# Altium PCB Spider Remote.PcbDoc
Units mm, origin at the board's own origin, x right, y up, seen from the top; angles counter-clockwise.
Board outline 49.15 x 64.13 mm, 2 copper layers (Top Layer, Bottom Layer); 14 components, 27 nets, 81 pads, 13 vias.
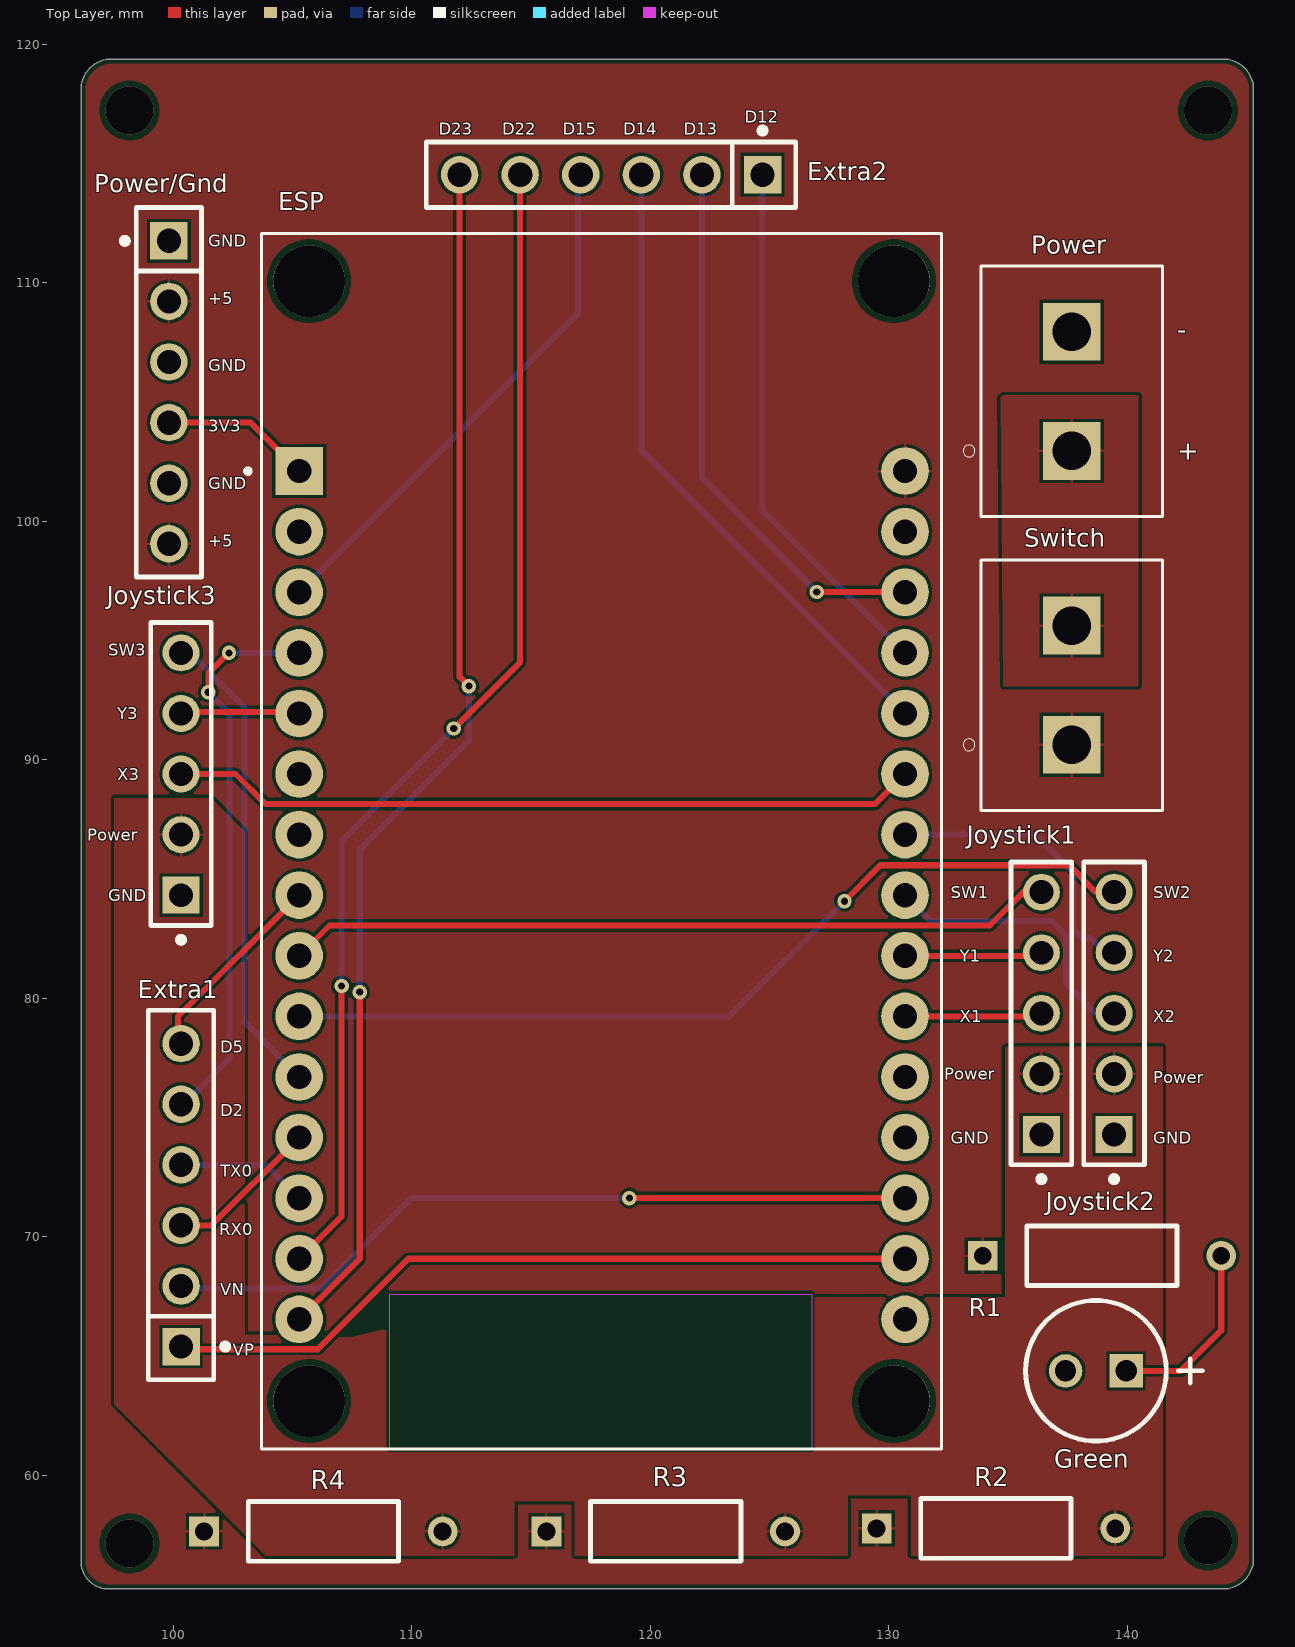
[diagram p0: Top Layer view]
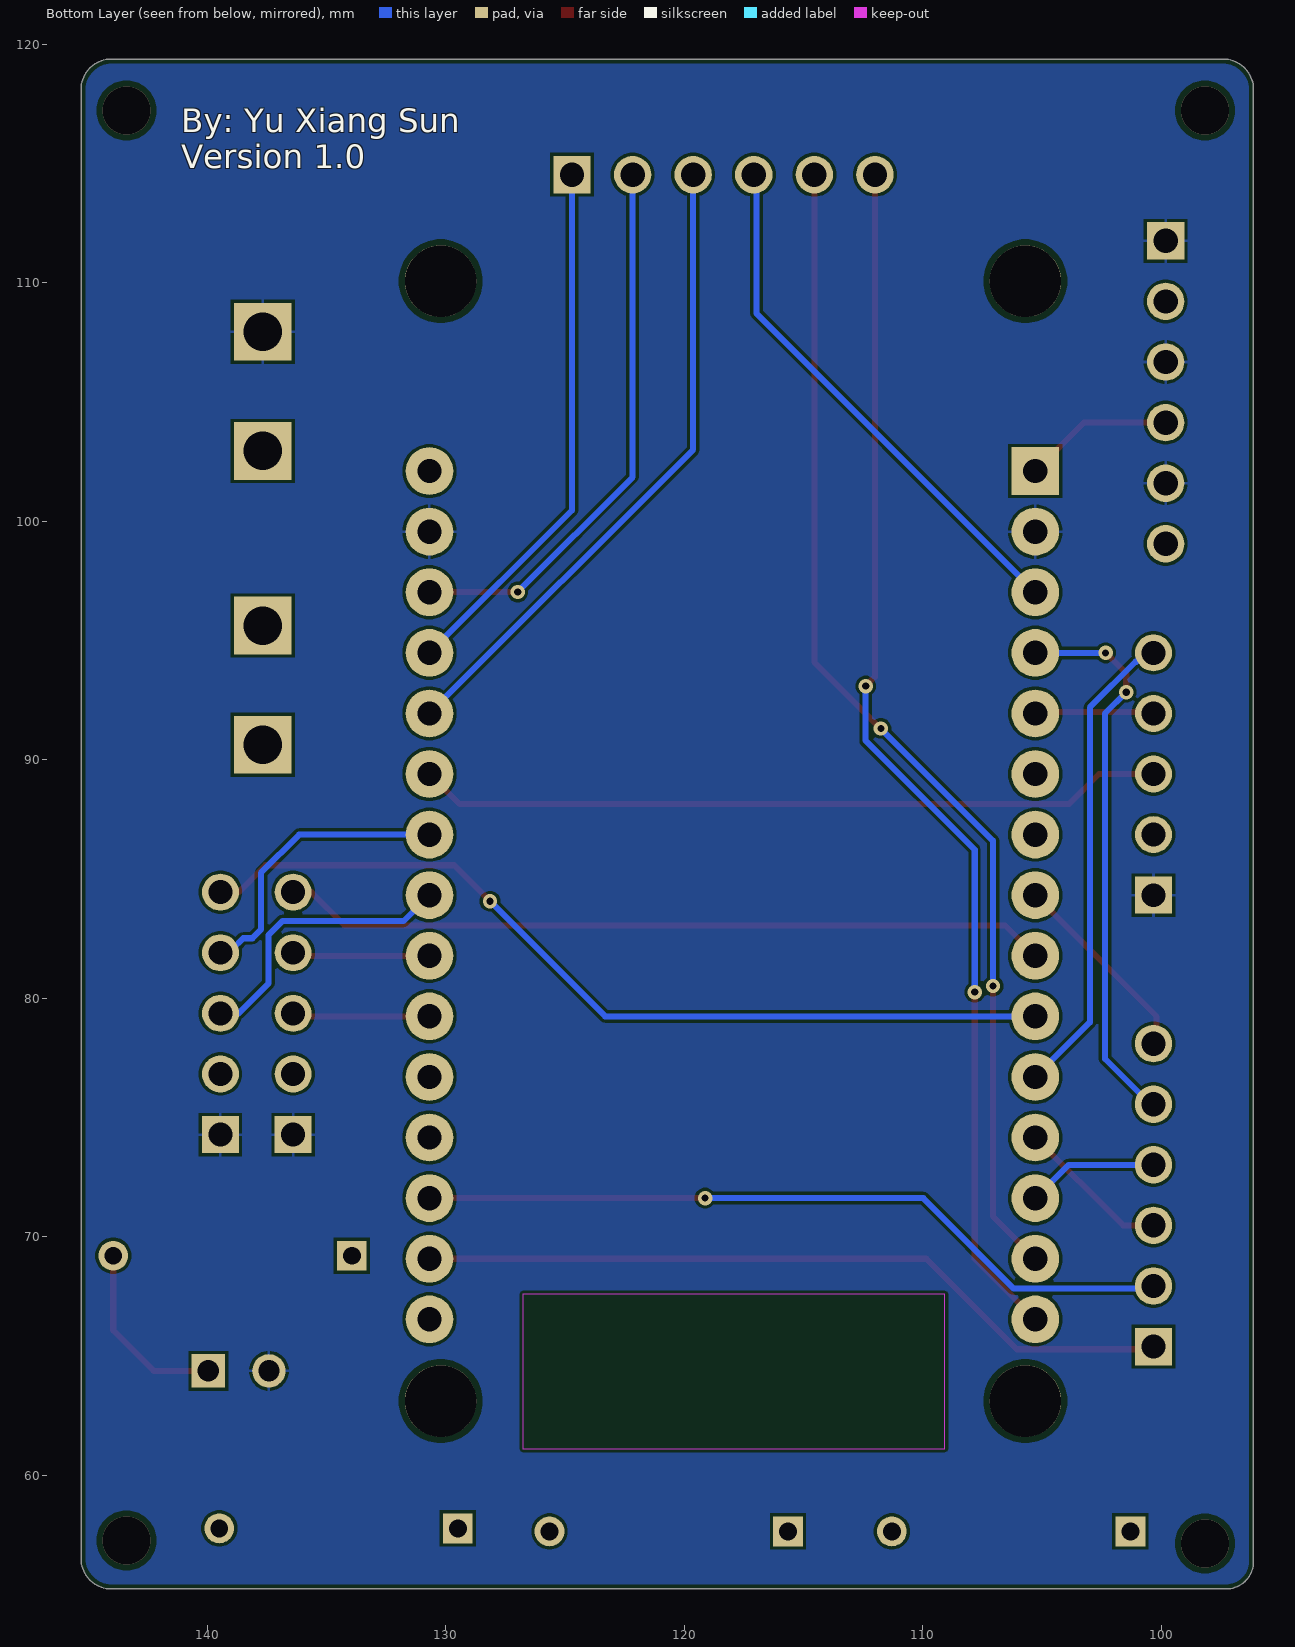
[diagram p1: Bottom Layer view, seen from below]
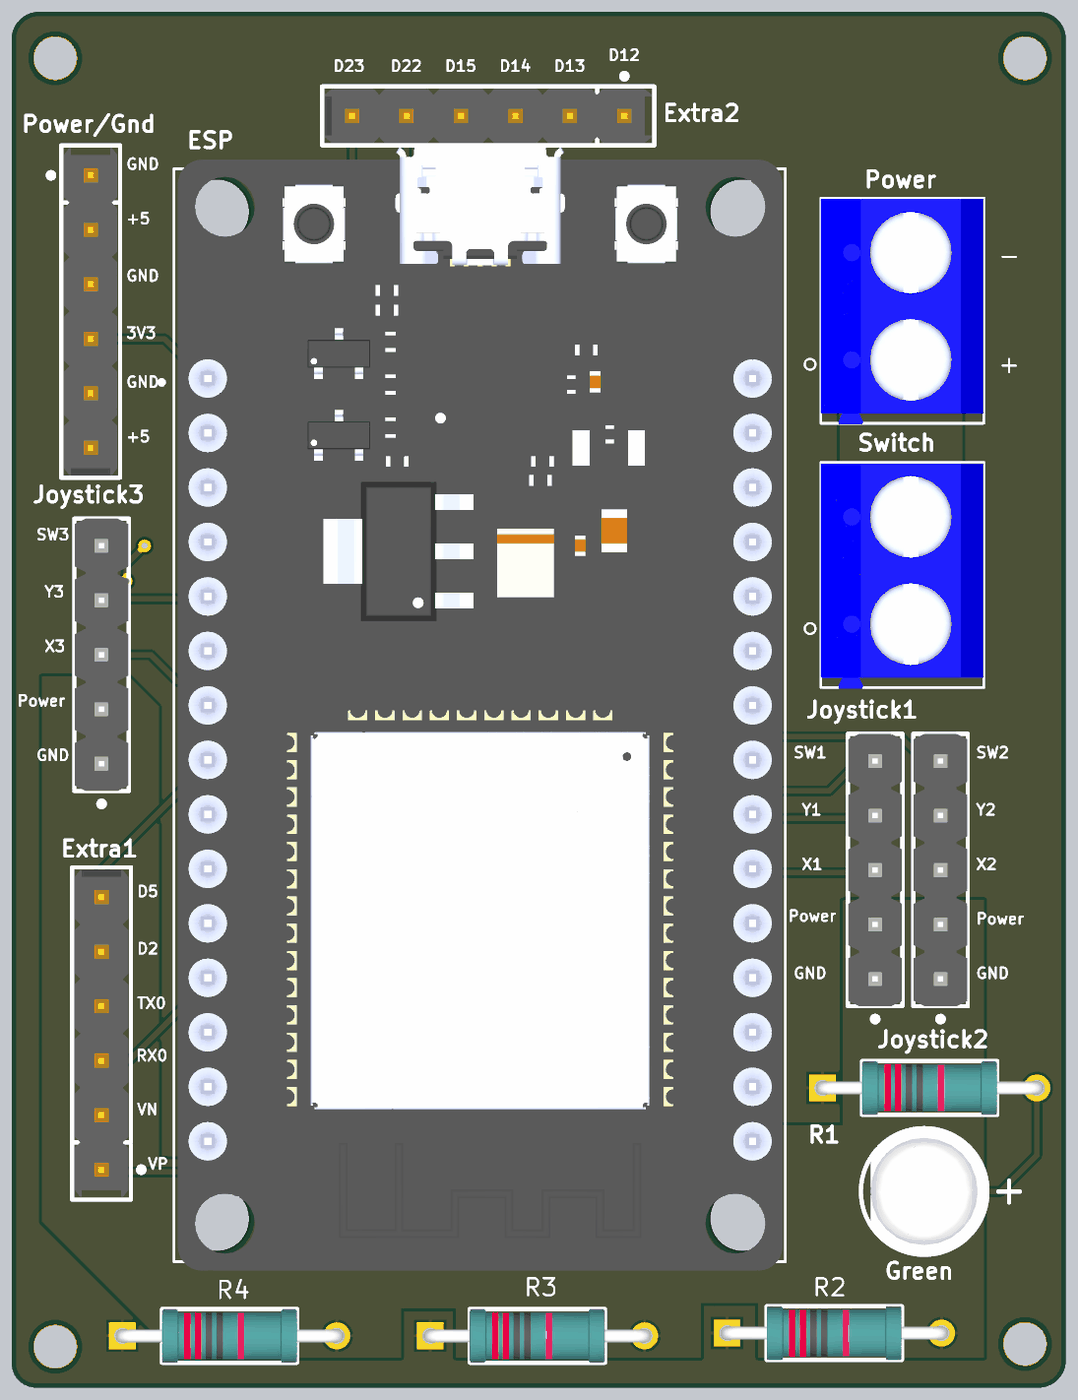
[diagram p2: 3D render of the assembled board from above, using the file's embedded part models]

## Layer stack, top to bottom
Top Solder: solder mask 0.0102, Solder Resist, Dk 3.5
Top Layer: signal copper 0.0356
Dielectric 1: dielectric 0.32, FR-4, Dk 4.8
Bottom Layer: signal copper 0.0356
Bottom Solder: solder mask 0.0102, Solder Resist, Dk 3.5

## Board outline
96.139,56.388 ccw(c97.282,56.388) 97.282,55.245 144.018,55.245 ccw(c144.018,56.515) 145.288,56.515 145.288,118.11 ccw(c144.018,118.11) 144.018,119.38 97.409,119.38 ccw(c97.409,118.11) 96.139,118.11

## Design rules (kind name [scope] priority, off if disabled: settings)
BoardOutlineClearance [All] p1: gap=0.2 ignorepadtopadclearanceinfootprint=FALSE
Clearance [All] p1: gap=0.127 ignorepadtopadclearanceinfootprint=FALSE except(0.25: Arc-Hole Track-Hole SMDPad-Hole THPad-Hole Via-Hole Fill-Hole Poly-Hole Region-Hole Text-Hole)
ComponentClearance [All] p1: gap=0.127 collisioncheckmode=3 verticalgap=0.127 showdistances=TRUE
DiffPairsRouting [All] p1: maxlimit=0.254 minlimit=0.127 mostfreqgap=0.127 toplayer_minwidth=0.127 toplayer_maxwidth=25.4 toplayer_prefwidth=0.127 bottomlayer_minwidth=0.127 bottomlayer_maxwidth=25.4 bottomlayer_prefwidth=0.127 maxuncoupledlength=12.7
Height [All] p1: minheight=0 maxheight=1816.048 prefheight=12.7
HoleSize [All] p1: absolutevalues=TRUE maxlimit=6.3 minlimit=0.3 maxpercent=80.000 minpercent=20.000
HoleToHoleClearance [All] p1: gap=0.25 allowstackedmicrovias=FALSE
MinimumAnnularRing [All] p1: minimumring=0.076
MinimumSolderMaskSliver [All] p1: minsoldermaskwidth=0
PlaneClearance [All] p1: clearance=0.127
PlaneConnect PlaneConnectPowerPads [InPadClass('PowerPads')] p1: planeconnectstyle=Direct reliefexpansion=0.508 reliefentries=4 reliefconductorwidth=0.254 reliefairgap=0.254
PlaneConnect [All] p2: pad.planeconnectstyle=Relief pad.reliefexpansion=0.3 pad.reliefentries=4 pad.reliefconductorwidth=0.127 pad.reliefairgap=0.127 via.planeconnectstyle=Direct via.reliefexpansion=0.3 via.reliefentries=4 via.reliefconductorwidth=0.127 via.reliefairgap=0.127
PolygonConnect PolygonConnectPowerPads [All vs (InPadClass('PowerPads'))] p1: connectstyle=Direct reliefconductorwidth=0.254 reliefentries=4 polygonreliefangle="90 Angle" airgapwidth=0.254
PolygonConnect [All] p2: thpad.connectstyle=Relief thpad.reliefconductorwidth=0.127 thpad.reliefentries=4 thpad.polygonreliefangle="90 Angle" thpad.airgapwidth=0.127 smdpad.connectstyle=Relief smdpad.reliefconductorwidth=0.127 smdpad.reliefentries=4 smdpad.polygonreliefangle="90 Angle" smdpad.airgapwidth=0.127 via.connectstyle=Direct via.reliefconductorwidth=0.127 via.reliefentries=4 via.polygonreliefangle="90 Angle" via.airgapwidth=0.127
RoutingVias [All] p1: holewidth=0.3 width=0.6 viastyle="Through Hole" minholewidth=0.3 minwidth=0.6 maxholewidth=0.6 maxwidth=6.6
SilkToSilkClearance [All] p1: silktosilkclearance=0
SilkToSolderMaskClearance [IsPad] p1: minsilkscreentomaskgap=0.127 clearancetoexposedcopper=TRUE
SolderMaskExpansion [All] p1: expansion=0.075 istentingtop=FALSE
SupplyNets "Schematic Supply Nets_2" [InNet('3V3')] p1: voltage=0.000
SupplyNets "Schematic Supply Nets_1" [InNet('+5')] p2: voltage=0.000
SupplyNets "Schematic Supply Nets" [InNet('GND')] p3: voltage=0.000
Width [All] p1: maxlimit=25.4 minlimit=0.127 preferedwidth=0.127 minimp=50.000000 maximp=50.000000 favimp=50.000000
20 further rules are at their usual default settings.

## Components (designator, comment, footprint, x,y, rotation, side; value= is the part's Value field where it differs from the comment)
ESP "ESP32-DEVKIT-V1" MODULE_ESP32_DEVKIT_V1 117.983,86.593 r0 top
Extra1 "6 Pin" FP-22-28-4063-MFG 100.33,71.755 r90 top
Extra2 "6 Pin" FP-22-28-4063-MFG 118.357,114.531 r180 top
Green "LED" KING-WP7113SGD_V 138.684,64.389 r180 top
Joystick1 "5 Pin" FP-90120-0125-MFG 136.398,79.375 r90 top
Joystick2 "5 Pin" FP-90120-0125-MFG 139.446,79.375 r90 top
Joystick3 "5 Pin" FP-90120-0125-MFG 100.33,89.408 r90 top
Power "Terminal" EBBA-02-C-SS-BU 137.668,102.95 r90 top
Power/Gnd "6 Pin" FP-22-28-4063-MFG 99.822,105.41 r270 top
R1 "10k" FP-MBB0207-MFG 138.938,69.215 r0 top
R2 "1.8k" FP-MBB0207-MFG 134.493,57.785 r0 top
R3 "1.8k" FP-MBB0207-MFG 120.65,57.658 r0 top
R4 "1.8k" FP-MBB0207-MFG 106.299,57.658 r0 top
Switch "Terminal" EBBA-02-C-SS-BU 137.668,90.631 r90 top

## Footprints (in the part's own frame and the unit in brackets; to place one, negate y for a bottom-side part, rotate by r counter-clockwise, add the part's x,y. Pads: shape width x height; smd on the part's side, far side on the other; paste and mask are expansions set on the pad)
EBBA-02-C-SS-BU [mm]
  rect 2.421x2.421 / inner round 2.421 / far side rect 2.421x2.421 hole 1.614: 1(0,0) 2(5,0)
  silkscreen extent -2.75,-3.8 7.75,4.55, body extent -2.79,-3.79 7.71,3.81, height 10
FP-22-28-4063-MFG [mm]
  rect 1.57x1.57 hole 1.02 paste-2539.97 mask+0: 1(-6.35,0)
  round 1.57 hole 1.02 paste-2539.97 mask+0: 2(-3.81,0) 3(-1.27,0) 4(1.27,0) 5(3.81,0) 6(6.35,0)
  silkscreen extent -7.75,-1.97 7.75,1.37, body extent -7.85,-1.47 7.85,1.47, height 0.25
FP-90120-0125-MFG [mm]
  rect 1.55x1.55 hole 1 paste-2539.97 mask+0: 1(-5.08,0)
  round 1.55 hole 1 paste-2539.97 mask+0: 2(-2.54,0) 3(0,0) 4(2.54,0) 5(5.08,0)
  silkscreen extent -7.07,-1.27 6.35,1.27, body extent -6.45,-1.37 6.45,1.37, height 0.25
FP-MBB0207-MFG [mm]
  rect 1.25x1.25 hole 0.75 paste-2539.97 mask+0: 1(-5,0)
  round 1.25 hole 0.75 paste-2539.97 mask+0: 2(5,0)
  silkscreen extent -3.15,-1.25 3.15,1.25, body extent -5.72,-1.35 5.72,1.35, height 0.25
KING-WP7113SGD_V [mm] "THD, 2-Leads, Dia 5.9mm, Body Length 8.6mm"
  rect 1.4x1.4 hole 0.889: 1(-1.27,0)
  round 1.4 hole 0.889: 2(1.27,0)
  silkscreen extent -4.47,-2.95 2.95,2.95, body extent -2.95,-2.95 2.5,2.95, height 15.5
MODULE_ESP32_DEVKIT_V1 [mm]
  rect 2x2 / inner round 2 / far side rect 2x2 hole 1.02: 1(-12.7,15.515)
  round 2 hole 1.02: 2(-12.7,12.975) 3(-12.7,10.435) 4(-12.7,7.895) 5(-12.7,5.355) 6(-12.7,2.815) 7(-12.7,0.275) 8(-12.7,-2.265) 9(-12.7,-4.805) 10(-12.7,-7.345) 11(-12.7,-9.885) 12(-12.7,-12.425) 13(-12.7,-14.965) 14(-12.7,-17.505) 15(-12.7,-20.045) 16(12.7,-20.045) 17(12.7,-17.505) 18(12.7,-14.965) 19(12.7,-12.425) 20(12.7,-9.885) 21(12.7,-7.345) 22(12.7,-4.805) 23(12.7,-2.265) 24(12.7,0.275) 25(12.7,2.815) 26(12.7,5.355) 27(12.7,7.895) 28(12.7,10.435) 29(12.7,12.975) 30(12.7,15.515)
  round 3 hole 3 unplated: ""(-12.28,-23.475) ""(-12.28,23.475) ""(12.23,-23.475) ""(12.23,23.475)
  Keep-Out Layer region: 8.78,-25.475 -8.91,-25.475 -8.91,-18.985 8.78,-18.985
  Keep-Out Layer region: 8.78,-25.475 -8.91,-25.475 -8.91,-18.985 8.78,-18.985
  silkscreen extent -14.95,-25.48 14.23,25.48, body extent -14.1,-25.9 14.1,26.55, height 7.05

## Part data
ESP: library part CMP-003-000000-1, "Dual core, Wi-Fi: 2.4 GHz up to 150 Mbits/s,BLE (Bluetooth Low Energy) and legacy Bluetooth, 32 bits, Up to 240 MHz", Package=None, Check_prices=https://www.snapeda.com/parts/ESP32-DEVKIT-V1/Do+it/view-part/?ref=eda, Component Type=Standard, Design Item ID=ESP32-DEVKIT-V1, MF="Do it", MP=ESP32-DEVKIT-V1, Pin Count=30, SnapEDA_Link=https://www.snapeda.com/parts/ESP32-DEVKIT-V1/Do+it/view-part/?ref=snap, Source=ESP32-DEVKIT-V1.SchLib
Extra1 Extra2 Power/Gnd: library part CMP-04776-000885-1, "CONN HEADER VERT 6POS 2.54MM", Color=Black, Contact Resistance=20mR, Current Rating=4A, Flammability Rating="UL94 V-0", Max Operating Temperature=75°C, Max Voltage Rating (AC)=250V, Max Voltage Rating (DC)=250.25kV, Min Operating Temperature=0°C, Package Quantity=1, Connector Type="Male Pin", Contact Material=Brass, Contact Mating Length=0.24inch, Contact Plating=Gold, Contact Type="Male Pin", Depth=2.49mm, Gender=Male, Glow Wire Compliant=Non-compliant, Housing Color=Black, Housing Material=Thermoplastic, Lead Free="Lead Free", Mount="Through Hole", Number of Circuits=6, Number of Contacts=6, Number of Positions=6, Number of Rows=1, Orientation=Straight, Packaging=Bulk, Pitch=2.54mm, Radiation Hardening=No, RoHS Compliant=Yes, Series="KK® 42375", Termination=Solder, Voltage Rating=250V, Voltage Rating (DC)=250V
Green: library part CMP-2100-03698-1, "LED Green, 62.5 mW, 25 mA, -40 to 85 degC, 2-Pin THD, RoHS, Bulk", Case/Package=Radial, Colour=Green, Forward Voltage=2.2V, Manufacturer=Kingbright, Package Description="2-Pin Through Hole Device, Dia 5.9 mm, Body Length 8.6 mm", Package Quantity=1000, Package Reference=WP7113SGD, Test Current=20mA, Datasheet URL=http://www.kingbrightusa.com/images/catalog/SPEC/WP7113SGD.pdf, Datasheet Version="Rev. 6B, 01/2015", Dominant Wavelength=568nm, Height=8.6mm, Illumination Colour=Green, Lead Free=LeadFree, Lens Style=Tinted, Luminous Intensity=40mcd, Packaging=Bulk, RoHSCompliant=true, Viewing Angle=30degrees, Wavelength=568nm
Joystick1 Joystick2 Joystick3: library part CMP-00257-00655425-1, "90120-0125 2.54mm Pitch C-Grid III Header, Single Row, Vertical, 5 Circuits, Tin (Sn) Plating", Contact Resistance=20mΩ, Current Rating=3A, Housing Color=Black, Manufacturer Lifecycle Status=ACTIVE, Max Operating Temperature=125°C, Max Voltage Rating (DC)=350.35kV, Min Operating Temperature=-55°C, Voltage Rating=350V, Contact Gender=Male, Contact Material=Brass, Contact Plating=Tin, Country of Origin=SK, Gender=Male, Glow Wire Compliant=Non-compliant, Housing Material=Polyester, Lead Free="Lead Free", Lead Length=2.9mm, Lead Pitch=2.54mm, Lifecycle Status=Production, Mating Post Length=6.75mm, Mount="Through Hole", NexarPartId=655425, Number of Circuits=5, Number of Contacts=5, Number of Pins=5, Number of Positions=5, Number of Rows=1, Orientation=Vertical, Packaging=Bulk, Pitch=2.54mm, Plating=Tin, Radiation Hardening=No, REACH SVHC="No SVHC", RoHS=Compliant, Schedule B=8536694040, Termination=Solder, Voltage Rating (AC)=350V
Power Switch: library part CMP-002-00072-2, "Terminal block, EURO BLOCK, slotted screw, 5.00mm pitch, blue, 2 position", Case/Package=None, Check_prices=https://www.snapeda.com/parts/EBBA-02-C-SS-BU/Adam+Tech/view-part/?ref=eda, Component Type=Standard, Design Item ID=EBBA-02-C-SS-BU, MF="Adam Tech", MP=EBBA-02-C-SS-BU, Pins=2, SnapEDA_Link=https://www.snapeda.com/parts/EBBA-02-C-SS-BU/Adam+Tech/view-part/?ref=snap, Source=EBBA-02-C-SS-BU.SchLib
R1 R2 R3 R4: library part CMP-02408-000035-1, "RES 10K OHM 0.6W 1% AXIAL", Case/Package=Conformal, Max Operating Temperature=155°C, Max Power Dissipation=600mW, Min Operating Temperature=-55°C, Resistance=10kR, Resistance Tolerance=1%, Resistor Type="Metal Film", Temperature Coefficient=50ppm/°C, Voltage Rating=300V, Construction=Cylindrical, Contact Plating=Tin, Diameter=2.5mm, Features="Automotive AEC-Q200", Lead Free="Lead Free", Length=6.5mm, Military Standard=Not, Number of Terminations=2, Packaging="Tape and Reel", Power Rating=600mW, Radiation Hardening=No, RoHS Compliant=Yes, Series="MBB 0207 - Professional", Technology="THIN FILM", Termination=Axial, Tolerance=1%, Voltage Rating (DC)=300V

## Via types
v1: diameter 0.6, hole 0.3, Top Layer to Bottom Layer, 9 vias
v2: diameter 2, hole 2, Top Layer to Bottom Layer, 4 vias

## Nets (pads, with @x,y where several pads share a name; then routed paths per layer and width w, separated by ;. In a path a pad name is that pad's centre, name@x,y a point inside that pad or via, vN(x,y) a via of type N, cw(c..) or ccw(c..) an arc to the next point about the centre after c; other vN are vias at no path point)
3V3: ESP.1 Power/Gnd.4 | length 6.3
  Top Layer w0.254: Power/Gnd.4 103.251,104.14 ESP.1
+5: ESP.30 Power/Gnd.2 Power/Gnd.6 R1.1 R2.1 R3.1 R4.1 Switch.1
D2: ESP.4 Extra1.5 | length 23.5
  Top Layer w0.254: v1(101.473,92.837) 101.473,93.624 v1(102.337,94.488)
  Bottom Layer w0.254: Extra1.5@100.393,75.501 102.362,77.47 102.362,91.948 v1(101.473,92.837) ; v1(102.337,94.488) ESP.4
D5: ESP.8 Extra1.6 | length 8.3
  Top Layer w0.254: Extra1.6@100.203,78.105 100.203,79.248 ESP.8
D12: ESP.27 Extra2.1 | length 22.5
  Bottom Layer w0.254: Extra2.1 124.707,100.464 ESP.27
D13: ESP.28 Extra2.2 | length 23.2
  Top Layer w0.254: v1(126.981,97.04) 126.987,97.034 130.677,97.034 ESP.28
  Bottom Layer w0.254: Extra2.2 122.167,101.854 v1(126.981,97.04)
D14: ESP.26 Extra2.3 | length 27.2
  Bottom Layer w0.254: Extra2.3 119.627,103.004 ESP.26
D15: ESP.3 Extra2.4 | length 22.3
  Bottom Layer w0.254: ESP.3 116.967,108.712 Extra2.4@116.967,114.531
D22: ESP.14 Extra2.5 | length 49.3
  Top Layer w0.254: ESP.14 107.061,70.866 v1(107.061,80.518) ; v1(111.76,91.313) 114.547,94.1 Extra2.5
  Bottom Layer w0.254: v1(107.061,80.518) 107.061,86.614 v1(111.76,91.313)
D23: ESP.15 Extra2.6 | length 51.1
  Top Layer w0.254: ESP.15 107.823,69.088 v1(107.823,80.264) ; Extra2.6 112.007,93.479 v1(112.395,93.091)
  Bottom Layer w0.254: v1(107.823,80.264) 107.823,86.233 112.395,90.805 v1(112.395,93.091)
GND: ESP.2 ESP.29 Green.2 Joystick1.1 Joystick2.1 Joystick3.1 Power.2 Power/Gnd.1 Power/Gnd.3 Power/Gnd.5
NetGreen_1: Green.1 R1.2 | length 7.8
  Top Layer w0.254: Green.1 142.24,64.389 143.938,66.087 R1.2
Power: Joystick1.2 Joystick2.2 Joystick3.2 R2.2 R3.2 R4.2
PowerTemp: Power.1 Switch.2
RX0: ESP.12 Extra1.3 | length 6.5
  Top Layer w0.254: Extra1.3 101.6,70.485 ESP.12
SW1: ESP.9 Joystick1.5 | length 31.5
  Top Layer w0.254: ESP.9 106.553,83.058 134.239,83.058 Joystick1.5@135.636,84.455
SW2: ESP.10 Joystick2.5 | length 36.5
  Top Layer w0.254: v1(128.143,84.074) 129.651,85.582 137.557,85.582 Joystick2.5@138.684,84.455
  Bottom Layer w0.254: ESP.10 123.318,79.248 v1(128.143,84.074)
SW3: ESP.11 Joystick3.5 | length 20.1
  Bottom Layer w0.254: Joystick3.5 100.681,94.488 101.054,94.115 101.084,94.115 102.997,92.202 102.997,78.994 ESP.11
TX0: ESP.13 Extra1.4 | length 5.5
  Bottom Layer w0.254: Extra1.4 103.886,73.025 ESP.13
VN: ESP.18 Extra1.2 | length 32
  Top Layer w0.254: v1(119.126,71.628) ESP.18
  Bottom Layer w0.254: Extra1.2 100.441,67.834 106.188,67.834 109.982,71.628 v1(119.126,71.628)
VP: ESP.17 Extra1.1 | length 32
  Top Layer w0.254: Extra1.1 100.441,65.294 106.061,65.294 109.855,69.088 ESP.17
X1: ESP.21 Joystick1.3 | length 5
  Top Layer w0.254: ESP.21 Joystick1.3@135.636,79.248
X2: ESP.23 Joystick2.3 | length 11.2
  Bottom Layer w0.254: ESP.23 131.77,83.241 136.85,83.241 137.427,82.664 137.427,80.632 Joystick2.3@138.684,79.375
X3: ESP.25 Joystick3.3 | length 31.4
  Top Layer w0.254: Joystick3.3 102.615,89.408 103.869,88.154 129.429,88.154 ESP.25
Y1: ESP.22 Joystick1.4 | length 5
  Top Layer w0.254: ESP.22 Joystick1.4@135.636,81.788
Y2: ESP.24 Joystick2.4 | length 12
  Bottom Layer w0.254: ESP.24 136.144,86.868 137.748,85.264 137.748,82.882 138.107,82.522 138.488,82.522 138.939,82.072 Joystick2.4@138.939,81.66
Y3: ESP.5 Joystick3.4 | length 5.6
  Top Layer w0.254: Joystick3.4@99.802,92.202 100.076,92.202 Joystick3.4 ; Joystick3.4@100.33,92.011 105.219,92.011 ESP.5
pads on no net: ESP. ESP.6 ESP.7 ESP.16 ESP.19 ESP.20
copper on no net:
  other v2: 98.171,57.15 143.383,57.277 98.171,117.221 143.383,117.221

## Polygon pours and split planes (outlines as drawn)
+5 on Top Layer "+5_L01_P003" (solid, pour order 3): 92.71,125.984 148.717,125.984 148.717,46.609 92.71,46.609
Power on Top Layer "POWER_L01_P000" (solid, remove dead copper, pour order 0): 128.27,56.642 128.27,59.182 130.937,59.182 130.937,56.642 141.478,56.642 141.478,77.978 135.001,77.978 134.874,78.105 134.874,67.467 114.192,67.467 107.442,65.786 102.997,65.913 102.997,86.995 101.6,88.392 97.536,88.392 97.536,62.992 103.886,56.642 114.3,56.642 114.3,58.928 116.84,58.928 116.84,56.642
PowerTemp on Top Layer "POWERTEMP_L01_P002" (solid, pour order 2): 134.692,105.283 140.462,105.283 140.462,93.091 134.804,93.091
GND on Bottom Layer "GND_L02_P001" (solid, pour order 1): 92.583,126.111 148.336,126.111 148.971,125.476 148.844,125.349 148.844,46.482 92.715,46.482

## Silkscreen, mask and mechanical layers (free items; w line width, h text height)
Top Overlay:
  text "D12" at 123.952,116.713 h0.5
  text "D23" at 111.125,116.205 h0.5
  text "D22" at 113.792,116.205 h0.5
  text "D15" at 116.332,116.205 h0.5
  text "D14" at 118.872,116.205 h0.5
  text "D13" at 121.412,116.205 h0.5
  text "GND" at 101.473,111.506 h0.5
  text "+5" at 101.473,109.093 h0.5
  text "-" at 142.086,107.65 h0.8
  text "GND" at 101.473,106.299 h0.5
  text "3V3" at 101.473,103.759 h0.5
  text "+" at 142.086,102.583 h0.8
  text "GND" at 101.473,101.346 h0.5
  text "+5" at 101.473,98.933 h0.5
  text "SW3" at 97.282,94.361 h0.5
  text "Y3" at 97.663,91.694 h0.5
  text "X3" at 97.663,89.154 h0.5
  text "Power" at 96.393,86.614 h0.5
  text "SW1" at 132.588,84.201 h0.5
  text "SW2" at 141.097,84.201 h0.5
  text "GND" at 97.282,84.074 h0.5
  text "Y1" at 132.969,81.534 h0.5
  text "Y2" at 141.097,81.534 h0.5
  text "X1" at 132.969,78.994 h0.5
  text "X2" at 141.097,78.994 h0.5
  text "D5" at 101.981,77.724 h0.5
  text "Power" at 132.334,76.581 h0.5
  text "Power" at 141.097,76.454 h0.5
  text "D2" at 101.981,75.057 h0.5
  text "GND" at 132.588,73.914 h0.5
  text "GND" at 141.097,73.914 h0.5
  text "TX0" at 101.981,72.517 h0.5
  text "RX0" at 101.935,70.071 h0.5
  text "VN" at 101.981,67.564 h0.5
  text "VP" at 102.489,65.024 h0.5
Bottom Overlay:
  text "By: Yu Xiang Sun / Version 1.0" at 141.097,114.808 h1
Mechanical 1:
  the board outline again, w0.254